# Altium PCB PCB.PcbDoc
Units mm, origin at the board's own origin, x right, y up, seen from the top; angles counter-clockwise.
Board outline 22 x 25 mm, 2 copper layers (Top Layer, Bottom Layer), stack 1.671 mm thick; 11 components, 8 nets, 55 pads, 14 vias.
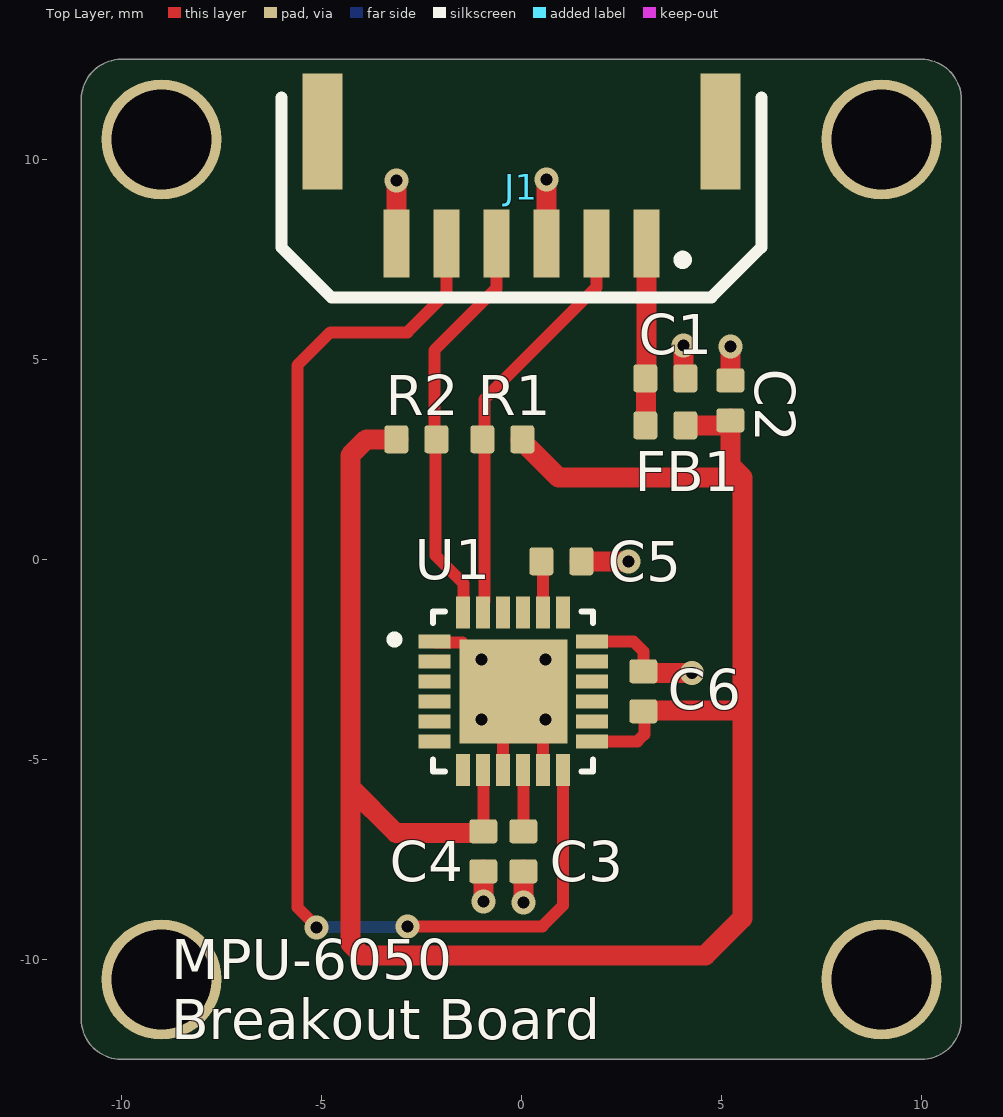
[diagram p0: Top Layer view]
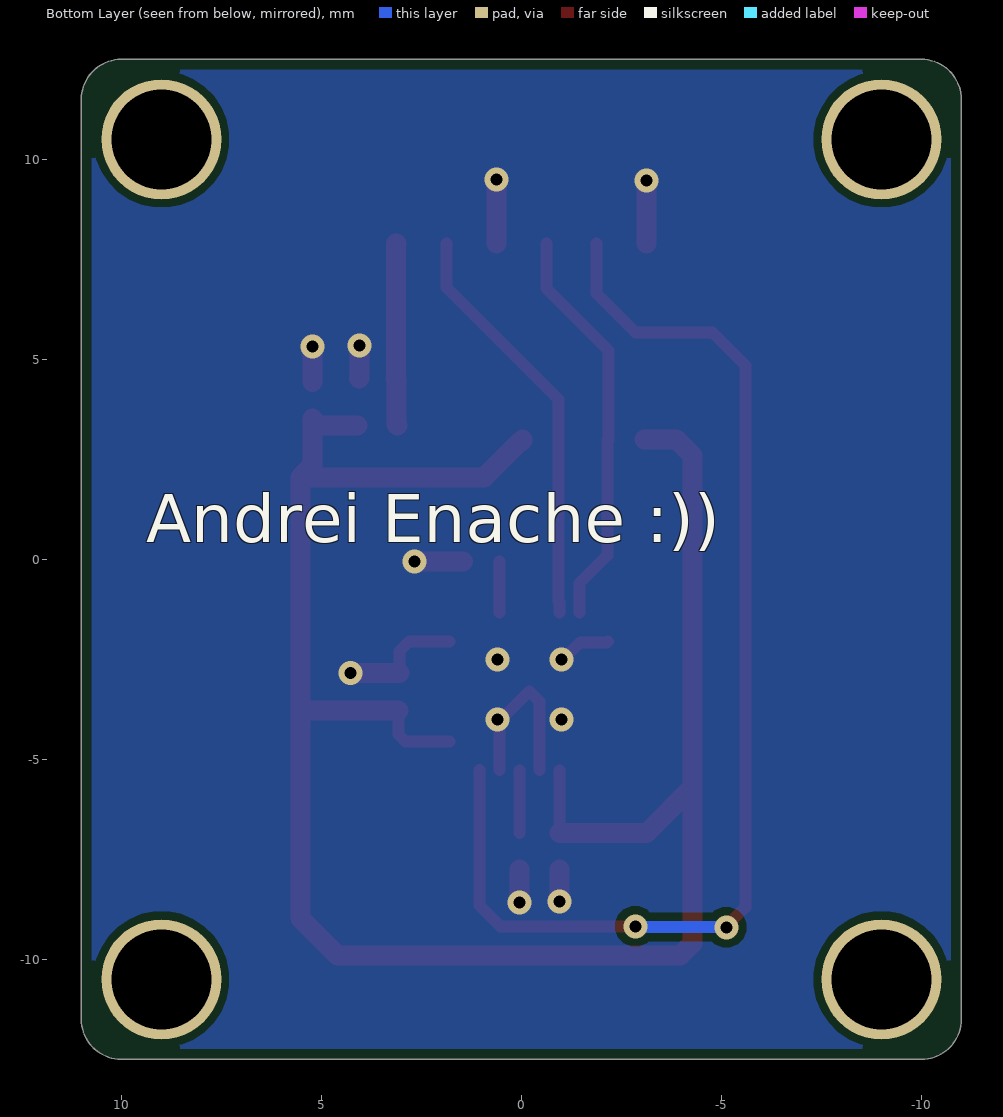
[diagram p1: Bottom Layer view, seen from below]
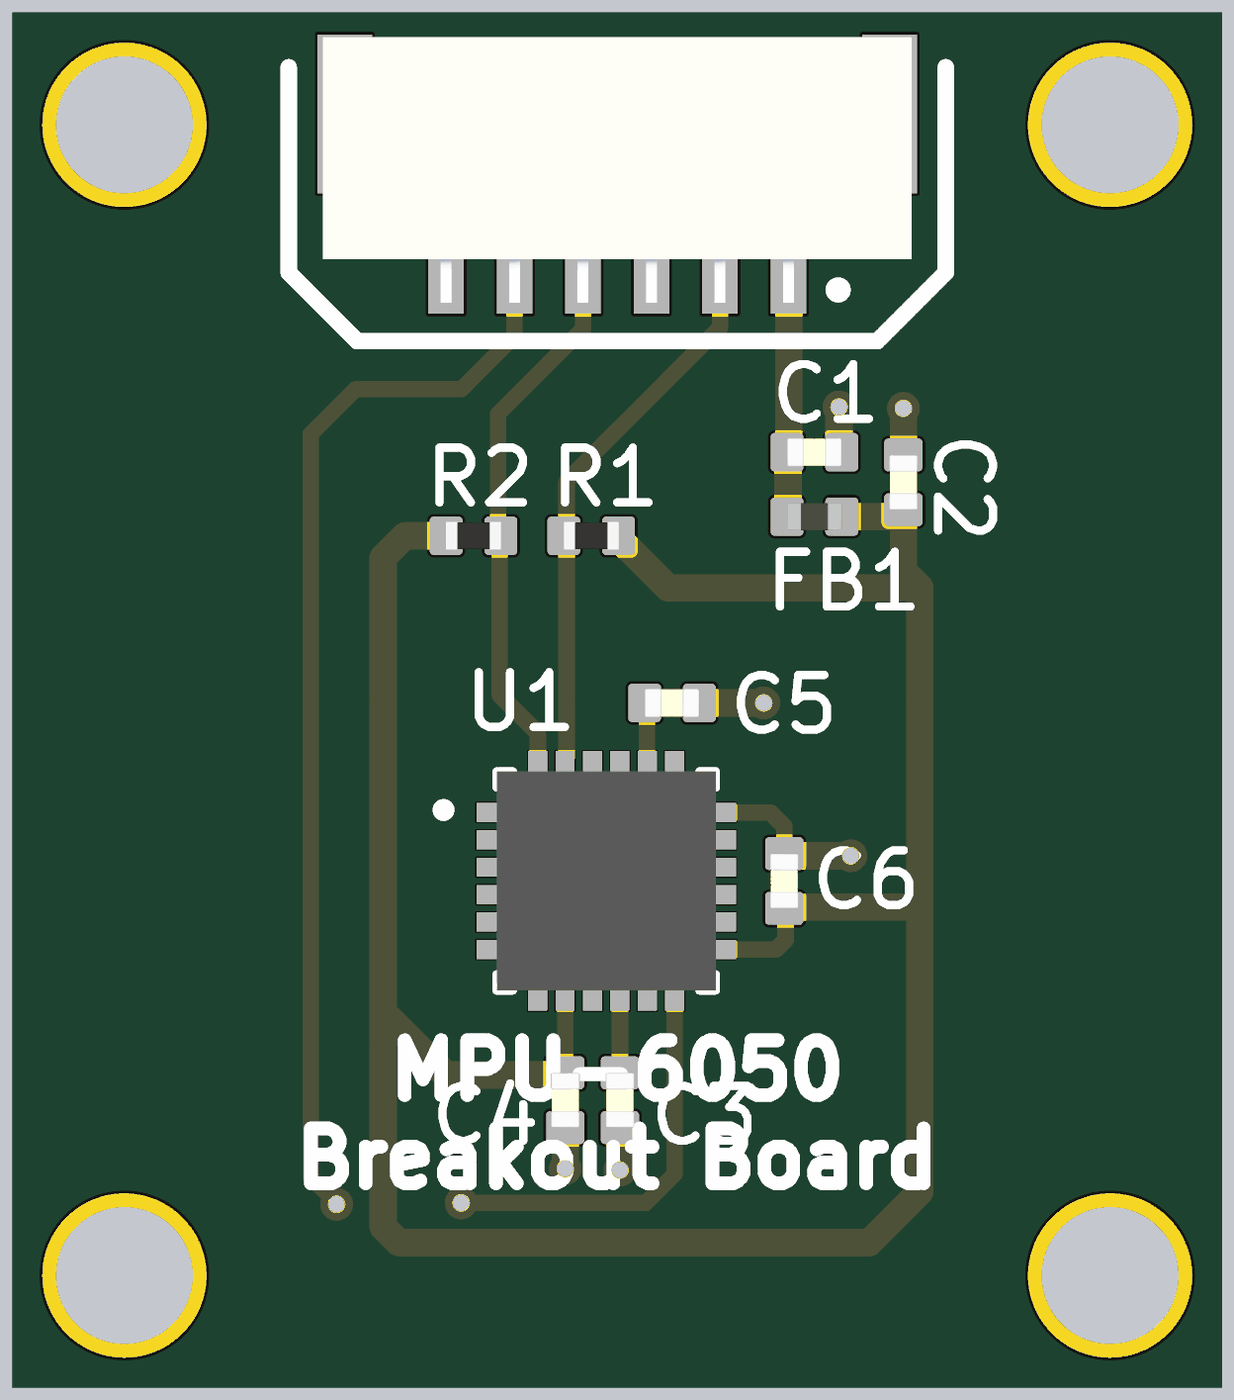
[diagram p2: 3D render of the assembled board from above, using the file's embedded part models]

## Layer stack, top to bottom
Top Solder: solder mask 0.0102, Solder Resist, Dk 3.5
Top Layer: signal copper 0.0356
Dielectric 1: dielectric 1.6, FR-4, Dk 4.5
Bottom Layer: signal copper 0.0356
Bottom Solder: solder mask 0.0102, Solder Resist, Dk 3.5

## Board outline
-11,11.5 cw(c-10,11.5) -10,12.5 10,12.5 cw(c10,11.5) 11,11.5 11,6.5 11,-11.5 cw(c10,-11.5) 10,-12.5 -10,-12.5 cw(c-10,-11.5) -11,-11.5

## Design rules (kind name [scope] priority, off if disabled: settings)
BoardOutlineClearance [All] p1: gap=0.254 ignorepadtopadclearanceinfootprint=FALSE except(0: Arc-SplitContinuation Track-SplitContinuation SMDPad-SplitContinuation THPad-SplitContinuation Via-SplitContinuation Fill-SplitContinuation Poly-SplitContinuation Region-SplitContinuation Text-SplitContinuation)
Clearance [All] p1: gap=0.2 ignorepadtopadclearanceinfootprint=TRUE except(0.102: Arc-Text Track-Text SMDPad-Text THPad-Text Fill-Text Poly-Text Region-Text Text-Text; 0.114: Arc-Arc Arc-Track Arc-SMDPad Arc-Via Track-Track Track-SMDPad Track-Via; 0.127: Via-Text; 0.152: Arc-THPad Track-THPad SMDPad-SMDPad SMDPad-THPad SMDPad-Via THPad-THPad THPad-Via Via-Via; 0.25: Arc-Hole Track-Hole SMDPad-Hole THPad-Hole Via-Hole Fill-Hole Poly-Hole Region-Hole Text-Hole)
HoleSize [All] p1: absolutevalues=TRUE maxlimit=6.3 minlimit=0.2 maxpercent=80.000 minpercent=20.000
MinimumAnnularRing MinimumAnnularRing_PTH [IsPad AND (HoleSize > 0)] p1: minimumring=0.25
MinimumAnnularRing MinimumAnnularRing_Via [IsVia] p2: minimumring=0.125
MinimumSolderMaskSliver [All] p1: minsoldermaskwidth=0.1
PlaneConnect [All] p1: pad.planeconnectstyle=Relief pad.reliefexpansion=0.508 pad.reliefentries=4 pad.reliefconductorwidth=0.254 pad.reliefairgap=0.254 via.planeconnectstyle=Direct via.reliefexpansion=0.508 via.reliefentries=4 via.reliefconductorwidth=0.254 via.reliefairgap=0.254
PolygonConnect [All] p1: thpad.connectstyle=Relief thpad.reliefconductorwidth=0.254 thpad.reliefentries=4 thpad.polygonreliefangle="90 Angle" thpad.airgapwidth=0.254 smdpad.connectstyle=Relief smdpad.reliefconductorwidth=0.254 smdpad.reliefentries=4 smdpad.polygonreliefangle="90 Angle" smdpad.airgapwidth=0.254 via.connectstyle=Direct via.reliefconductorwidth=0.254 via.reliefentries=4 via.polygonreliefangle="90 Angle" via.airgapwidth=0.254
RoutingVias [All] p1: holewidth=0.3 width=0.45 viastyle="Through Hole" minholewidth=0.2 minwidth=0.45 maxholewidth=0.5 maxwidth=0.6
SilkToSilkClearance [All] p1: silktosilkclearance=0.15
SilkToSolderMaskClearance [IsPad] p1: minsilkscreentomaskgap=0.15 clearancetoexposedcopper=TRUE
SolderMaskExpansion [All] p1: expansion=0.05 istentingtop=FALSE
SupplyNets "Schematic Supply Nets_5" [InNet('+3V3_CONN')] p1: voltage=0.000
SupplyNets "Schematic Supply Nets_4" [InNet('+3V3')] p2: voltage=0.000
SupplyNets "Schematic Supply Nets" [InNet('GND')] p3: voltage=0.000
UnRoutedNet [All] p1: checkbadconnections=TRUE
Width [All] p1: maxlimit=5 minlimit=0.1 preferedwidth=0.25
24 further rules are at their usual default settings.

## Components (designator, comment, footprint, x,y, rotation, side; value= is the part's Value field where it differs from the comment)
C1 "100n" CAP_0402 3.6,4.525 r180 top
C2 "100n" CAP_0402 5.225,3.975 r270 top
C3 "100n" CAP_0402 0.05,-7.3 r90 top
C4 "10n" CAP_0402 -0.95,-7.3 r90 top
C5 "2n2" CAP_0402 1,-0.05 r180 top
C6 "100n" CAP_0402 3.05,-3.3 r270 top
FB1 "FB_0402" FB_0402 3.6,3.35 r0 top
J1 "SM06B-GHS-TB" SM06B-GHS-TB 0,9.3 r180 top
R1 "2k2" RES_0402 -0.475,3 r0 top
R2 "2k2" RES_0402 -2.625,3 r180 top
U1 "MPU-6050" MPU-6050 -0.2,-3.3 r0 top

## Footprints (in the part's own frame and the unit in brackets; to place one, negate y for a bottom-side part, rotate by r counter-clockwise, add the part's x,y. Pads: shape width x height; smd on the part's side, far side on the other; paste and mask are expansions set on the pad)
CAP_0402 [mm]
  rrect25% 0.6x0.7 smd: 1(-0.5,0) 2(0.5,0)
  body extent -0.5,-0.26 0.5,0.26, height 0.37
FB_0402 [mm]
  rrect25% 0.6x0.7 smd: 1(-0.5,0) 2(0.5,0)
  body extent -0.5,-0.25 0.5,0.25, height 0.51
MPU-6050 [mm]
  rect 0.8x0.35 smd mask+0.025: 1(-1.972,1.251) 2(-1.972,0.751) 3(-1.972,0.251) 4(-1.972,-0.249) 5(-1.972,-0.749) 6(-1.972,-1.249) 13(1.968,-1.249) 14(1.968,-0.749) 15(1.968,-0.249) 16(1.968,0.251) 17(1.968,0.751) 18(1.968,1.251)
  rect 0.35x0.8 smd mask+0.025: 7(-1.252,-1.969) 8(-0.752,-1.969) 9(-0.252,-1.969) 10(0.248,-1.969) 11(0.748,-1.969) 12(1.248,-1.969) 19(1.248,1.971) 20(0.748,1.971) 21(0.248,1.971) 22(-0.252,1.971) 23(-0.752,1.971) 24(-1.252,1.971)
  rect 2.7x2.6 smd mask+0.025: 25(0,0)
  silkscreen extent -3.07,-2 2,2, body extent -2,-2 2,2, height 0.94
RES_0402 [mm]
  rrect25% 0.6x0.7 smd: 1(-0.5,0) 2(0.5,0)
  body extent -0.5,-0.25 0.5,0.25, height 0.3
SM06B-GHS-TB [mm]
  rect 0.65x1.7 smd: 1(-3.125,1.4) 2(-1.875,1.4) 3(-0.625,1.4) 4(0.625,1.4) 5(1.875,1.4) 6(3.125,1.4)
  rect 1x2.9 smd: ""(-4.975,-1.4) ""(4.975,-1.4)
  silkscreen extent -6,-2.25 6,2.75, body extent -5.38,-2.8 5.38,2.05, height 4.26

## Part data
C1 C2 C3 C4 C5 C6: library part CAP_0402, "Capacitor SMD 0402 Generic"
FB1: "Ferrite Bead SMD 0402"
J1: "Header Connector 6 Position 1.25MM Pitch SMD Horizontal JST GH"
R1 R2: library part RES_0402, "Resistor SMD 0402 Generic"
U1: "IMU (Inertial Measurement Unit), 6-Axis, Accelerometer, Gyroscope", Manufacturer=TDK, Manufacturer Part Number=MPU-6050

## Free pads (board coordinates)
  round 3 hole 2.5 mask+0.05: MH(-9,-10.5) MH(-9,10.5) MH(9,-10.5) MH(9,10.5)

## Via types
v1: diameter 0.6, hole 0.3, Top Layer to Bottom Layer, tented both sides, 14 vias

## Nets (pads, with @x,y where several pads share a name; then routed paths per layer and width w, separated by ;. In a path a pad name is that pad's centre, name@x,y a point inside that pad or via, vN(x,y) a via of type N, cw(c..) or ccw(c..) an arc to the next point about the centre after c; other vN are vias at no path point)
+3V3: C2.2 C4.2 C6.2 FB1.2 R1.2 R2.2 U1.8 U1.13 | length 53.4
  Top Layer w0.3: C4.2@-0.95,-6.84 U1.8@-0.95,-5.275 ; U1.13@1.8,-4.55 2.899,-4.55 3.075,-4.374 C6.2@3.075,-3.785
  Top Layer w0.5: R2.2@-3.075,3 -3.875,3 -4.275,2.6 -4.275,-5.7 ; C4.2@-0.95,-6.84 -3.135,-6.84 -4.275,-5.7 ; R1.2@-0.025,3 -0.025,2.975 0,2.95 0.025,2.95 0.925,2.05 5.525,2.05 ; C6.2@3.075,-3.785 3.085,-3.775 5.525,-3.775 ; FB1.2 5.06,3.35 5.225,3.515 5.225,2.35 5.525,2.05 ; -4.275,-5.7 -4.275,-9.607 -3.982,-9.9 4.6,-9.9 5.525,-8.975 5.525,-3.775 ; 5.525,-3.775 5.525,2.05
+3V3_CONN: C1.2 FB1.1 J1.1 | length 4.6
  Top Layer w0.5: FB1.1 3.12,3.37 3.12,4.505 3.14,4.525 3.132,4.532 3.132,7.893 J1.1
GND: C1.1 C2.1 C3.1 C4.1 C5.1 C6.1 J1.3 J1.6 U1.1 U1.9 U1.11 U1.18 U1.25 | length 16.5
  Top Layer w0.3: U1.1 -2.147,-2.074 -1.476,-2.074 U1.25@-1.025,-2.525 ; U1.9 -0.452,-3.552 U1.25 0.548,-4.048 U1.11 ; U1.18@1.8,-2.05 2.8,-2.05 3.05,-2.3 C6.1@3.05,-2.84
  Top Layer w0.5: J1.6 v1(-3.125,9.475) ; v1(-0.95,-8.55) C4.1@-0.95,-7.76 ; v1(0.05,-8.575) C3.1@0.05,-7.76 ; J1.3 v1(0.625,9.5) ; C5.1@1.46,-0.05 v1(2.675,-0.05) ; C6.1@3.05,-2.84 v1(4.265,-2.84) ; v1(4.05,5.35) 4.05,4.535 C1.1@4.06,4.525 ; C2.1@5.225,4.435 v1(5.225,5.325)
  other v1: -1,-4 0.6,-4 -1,-2.5 0.6,-2.5
I2C_SCL: J1.2 R1.1 U1.23 | length 10.4
  Top Layer w0.3: U1.23@-0.95,-1.325 -0.95,-1.075 -0.925,-1.05 -0.925,3 -0.925,4 1.875,6.8 J1.2
I2C_SDA: J1.4 R2.1 U1.24 | length 10.2
  Top Layer w0.3: U1.24@-1.45,-1.325 -1.45,-0.6 -2.15,0.1 -2.15,2.975 -2.175,3 -2.175,5.225 -0.625,6.775 J1.4
IMU_CPOUT: C5.2 U1.20 | length 1.3
  Top Layer w0.3: C5.2@0.54,-0.05 0.545,-0.055 0.545,-1.32 U1.20@0.55,-1.325
IMU_INT: J1.5 U1.12 | length 29.8
  Top Layer w0.3: v1(-5.125,-9.2) -5.125,-9.174 -5.6,-8.699 -5.6,4.85 -4.775,5.675 -2.85,5.675 -1.875,6.65 J1.5 ; v1(-2.85,-9.175) 0.525,-9.175 1.048,-8.652 U1.12
  Bottom Layer w0.3: v1(-5.125,-9.2) -5.113,-9.188 -2.862,-9.188 v1(-2.85,-9.175)
IMU_REG: C3.2 U1.10 | length 1.6
  Top Layer w0.3: C3.2@0.05,-6.84 U1.10@0.05,-5.275
pads on no net: J1. U1.2 U1.3 U1.4 U1.5 U1.6 U1.7 U1.14 U1.15 U1.16 U1.17 U1.19 U1.21 U1.22

## Polygon pours and split planes (outlines as drawn)
GND on Bottom Layer "GND_L02_P000" (solid, pour order 0): -11,11.5 cw(c-10,11.5) -10,12.5 10,12.5 cw(c10,11.5) 11,11.5 11,6.5 11,-11.5 cw(c10,-11.5) 10,-12.5 -10,-12.5 cw(c-10,-11.5) -11,-11.5

## Silkscreen, mask and mechanical layers (free items; w line width, h text height)
Top Overlay:
  text "MPU-6050 / Breakout Board" at -8.75,-12 h1
Bottom Overlay:
  text "Andrei Enache :))" at 9.375,0.425 h1.2
Board Shape:
  lines w0.1: 11,6.5 ccw(c11,6.5) 11,6.5 ; 11,6.5 11,11.5 ccw(c10,11.5) 10,12.5 -10,12.5 ccw(c-10,11.5) -11,11.5 -11,6.5 -11,0.5 -11,-11.5 ccw(c-10,-11.5) -10,-12.5 10,-12.5 ccw(c10,-11.5) 11,-11.5 11,0.5 11,6.5